# Altium PCB Main-PCB-v1.0.PcbDoc (part 1 of 5)
Units mil, origin at the board's own origin, x right, y up, seen from the top; angles counter-clockwise.
Board outline 8760 x 2778 mil, 2 copper layers (Top Layer, Bottom Layer), stack 57 mil thick; 252 components, 204 nets, 813 pads, 473 vias.
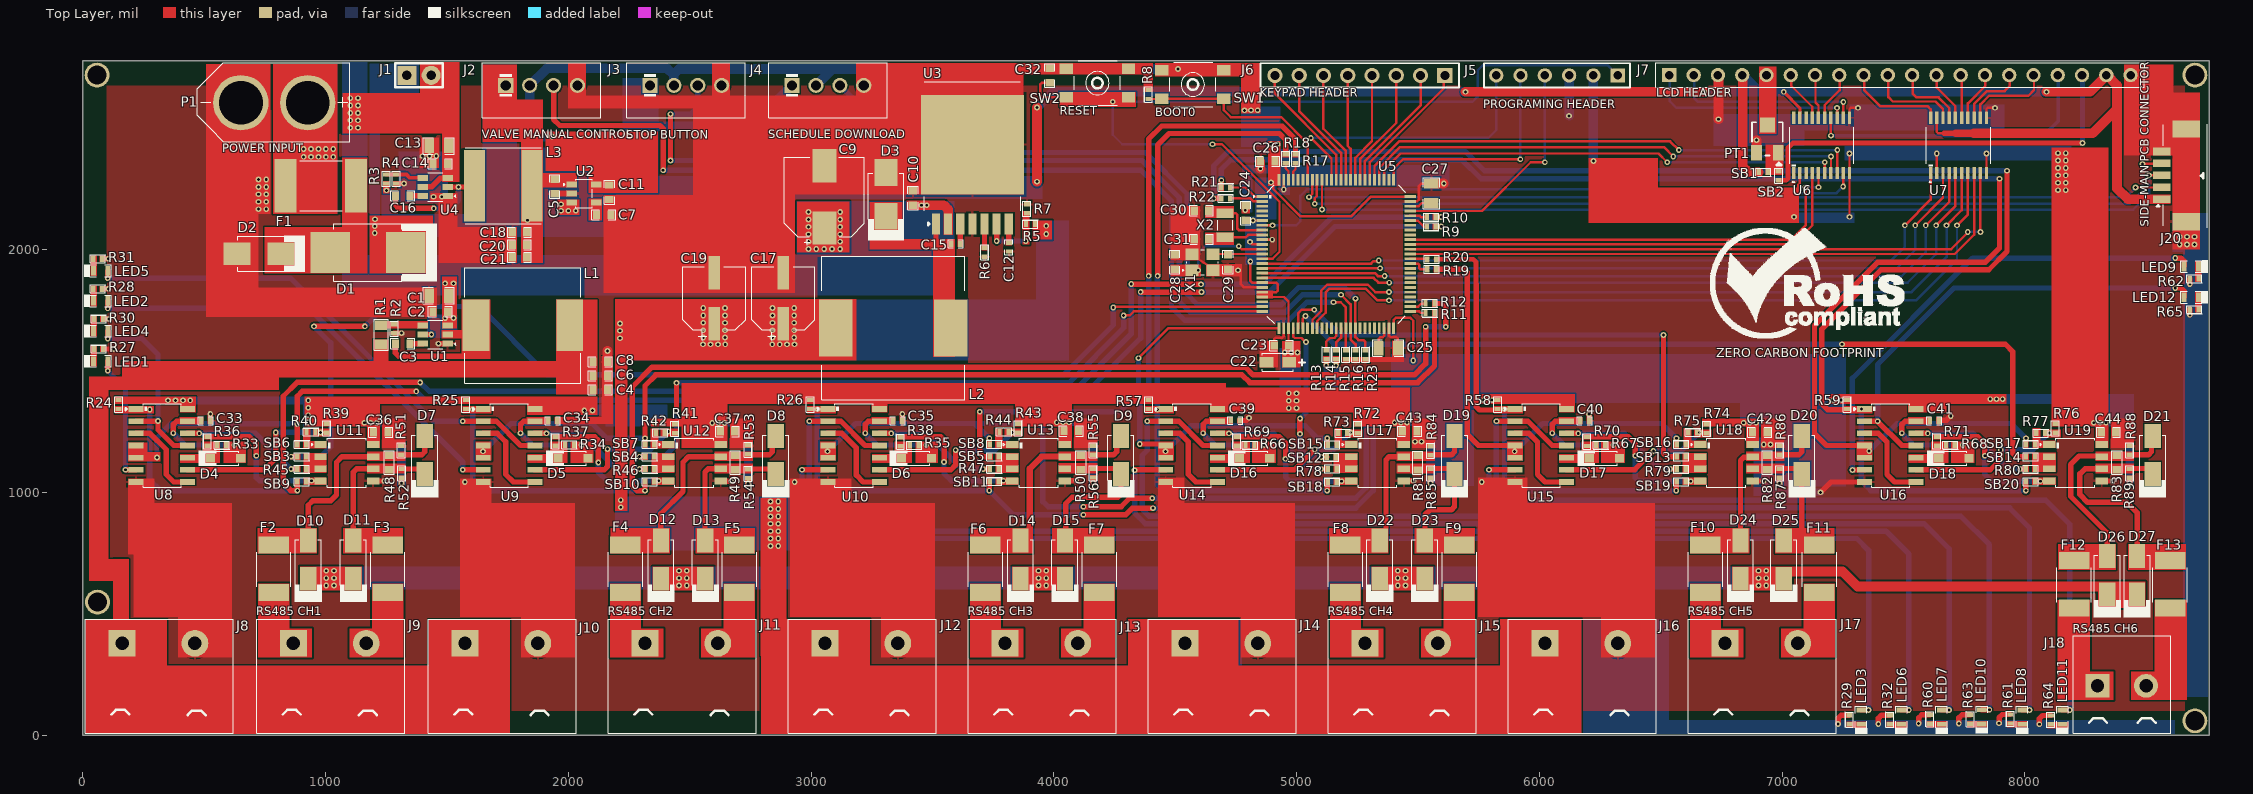
[diagram p0: Top Layer view]
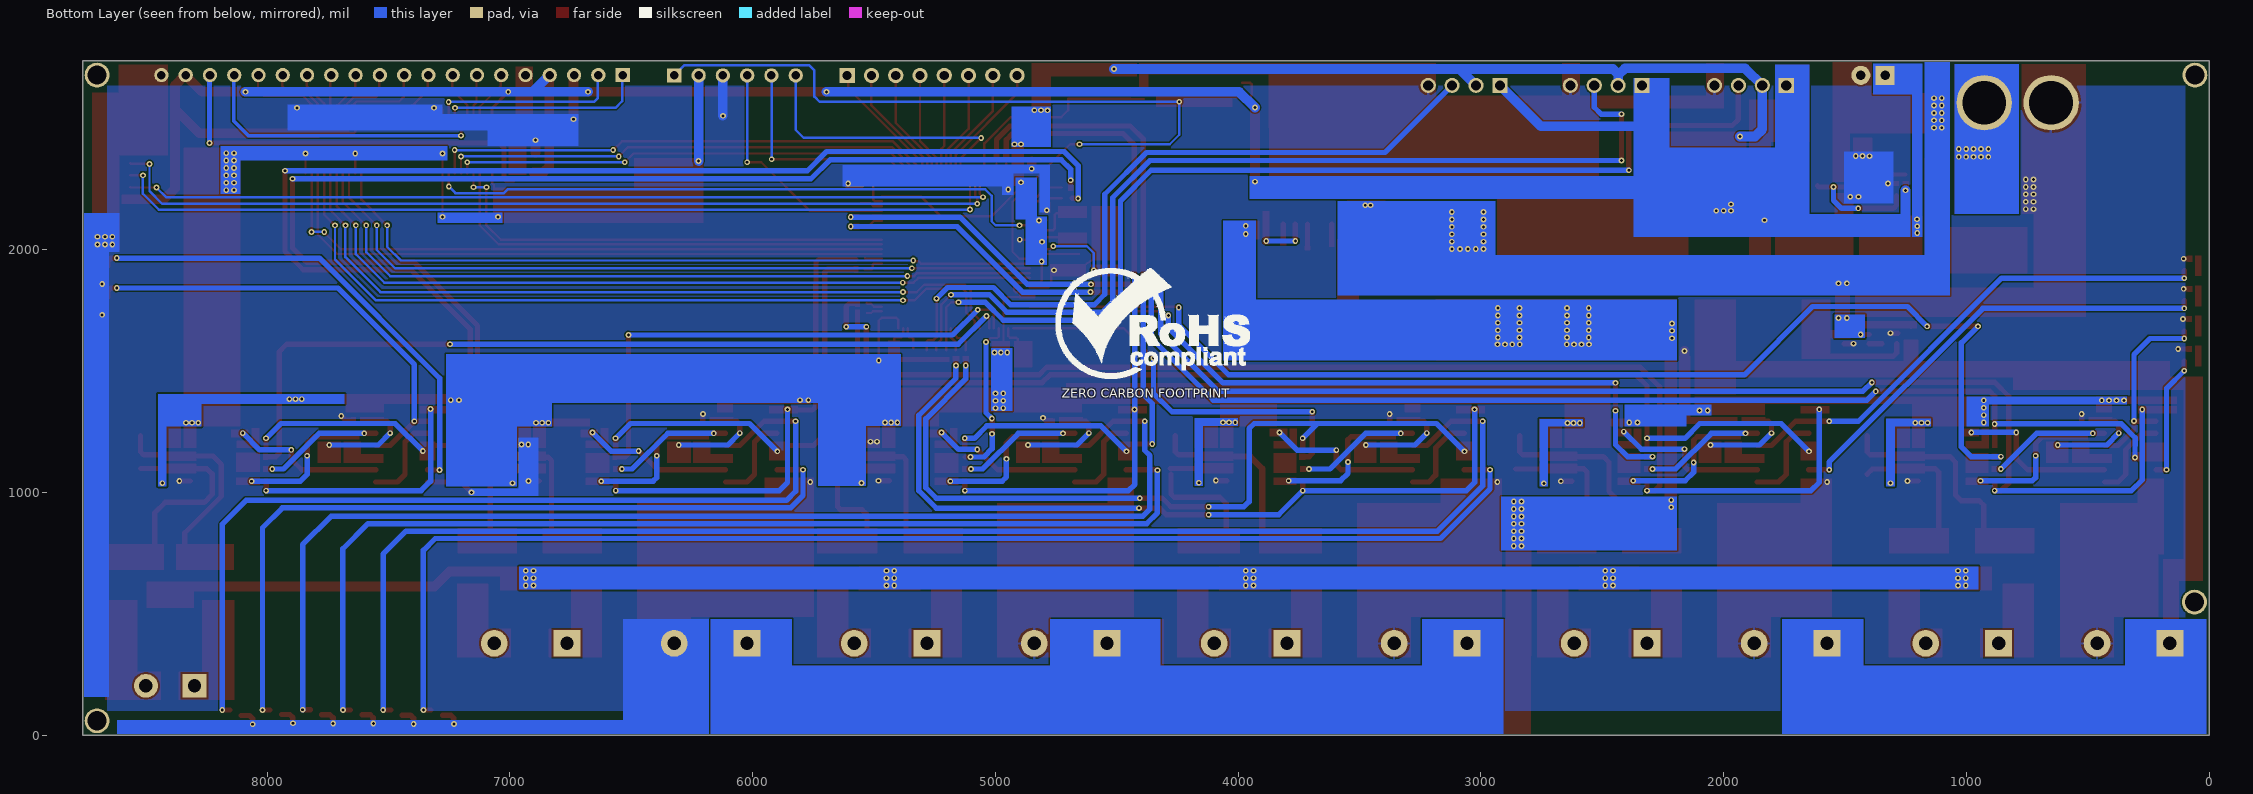
[diagram p1: Bottom Layer view, seen from below]
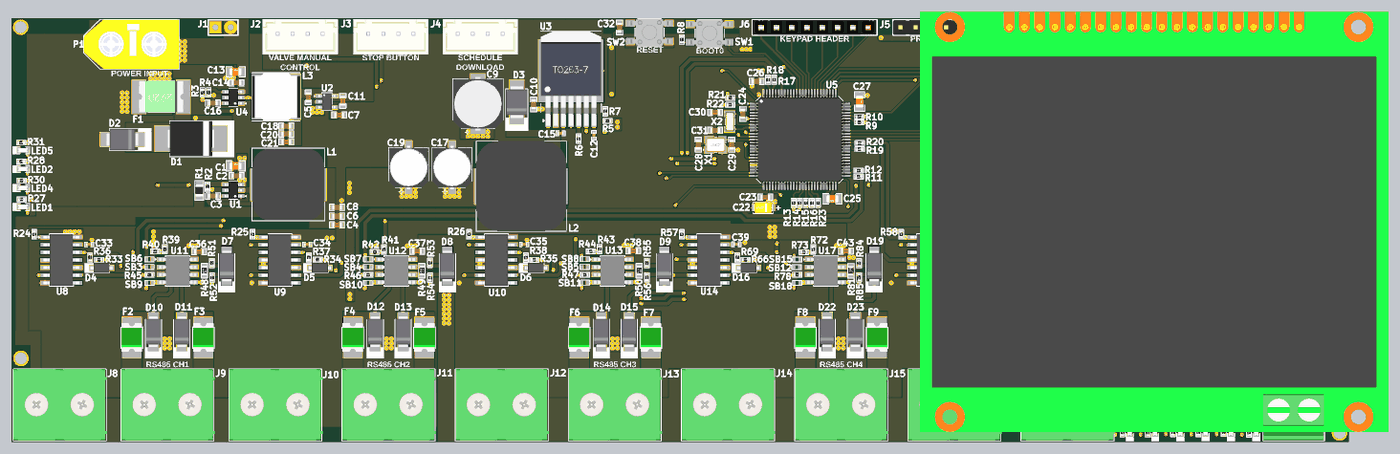
[diagram p4: 3D render of the assembled board from above, using the file's embedded part models]

## Layer stack, top to bottom
Top Solder: solder mask 3, Solder Resist, Dk 3.5
Top Layer: signal copper 10
Dielectric 1: dielectric 37, FR-4, Dk 4.8
Bottom Layer: signal copper 10
Bottom Solder: solder mask 3, Solder Resist, Dk 3.5

## Board outline
0,0 0,2778 8760,2778 8760,0

## Design rules (kind name [scope] priority, off if disabled: settings)
Clearance [All] p1: gap=7 ignorepadtopadclearanceinfootprint=FALSE except(0: Arc-Hole Track-Hole SMDPad-Hole THPad-Hole Via-Hole Fill-Hole Poly-Hole Region-Hole Text-Hole; 4: Arc-SMDPad Track-SMDPad SMDPad-SMDPad)
HoleSize [All] p1: absolutevalues=TRUE maxlimit=1000 minlimit=1 maxpercent=80.000 minpercent=20.000
MinimumSolderMaskSliver [All] p1: minsoldermaskwidth=0
PolygonConnect [All] p1: thpad.connectstyle=Relief thpad.reliefconductorwidth=10 thpad.reliefentries=4 thpad.polygonreliefangle="90 Angle" thpad.airgapwidth=10 smdpad.connectstyle=Relief smdpad.reliefconductorwidth=10 smdpad.reliefentries=4 smdpad.polygonreliefangle="90 Angle" smdpad.airgapwidth=10 via.connectstyle=Direct via.reliefconductorwidth=10 via.reliefentries=4 via.polygonreliefangle="90 Angle" via.airgapwidth=10
RoutingVias [All] p1: holewidth=11.81 width=23.62 viastyle="Through Hole" minholewidth=11.81 minwidth=23.62 maxholewidth=11.81 maxwidth=23.62
SilkToSilkClearance [All] p1: silktosilkclearance=0
SilkToSolderMaskClearance [IsPad] p1: minsilkscreentomaskgap=0 clearancetoexposedcopper=TRUE
SolderMaskExpansion [All] p1: expansion=4 istentingtop=FALSE
Width [All] p1: maxlimit=50 minlimit=10 preferedwidth=22 minimp=50.000000 maximp=50.000000 favimp=50.000000
26 further rules are at their usual default settings.

## Classes and differential pairs
component class U_RS485-UART: C33 C34 C35 C36 C37 C38 C39 C40 C41 C42 C43 C44 D4 D5 D6 D7 D8 D9 D10 D11 D12 D13 D14 D15 D16 D17 D18 D19 D20 D21 D22 D23 D24 D25 D26 D27 F2 F3 F4 F5 F6 F7 F8 F9 F10 F11 F12 F13 J8 J9 J10 J11 J12 J13 J14 J15 J16 J17 J18 LED1 LED2 LED3 LED4 LED5 LED6 LED7 LED8 LED9 LED10 LED11 LED12 R24 R25 R26 R27 R28 R29 R30 R31 R32 R33 R34 R35 R36 R37 R38 R39 R40 R41 R42 R43 R44 R45 R46 R47 R48 R49 R50 R51 R52 R53 R54 R55 R56 R57 R58 R59 R60 R61 R62 R63 R64 R65 R66 R67 R68 R69 R70 R71 R72 R73 R74 R75 R76 R77 R78 R79 R80 R81 R82 R83 R84 R85 R86 R87 R88 R89 SB3 SB4 SB5 SB6 SB7 SB8 SB9 SB10 SB11 SB12 SB13 SB14 SB15 SB16 SB17 SB18 SB19 SB20 U8 U9 U10 U11 U12 U13 U14 U15 U16 U17 U18 U19
component class U_Power-Sheet: C1 C2 C3 C4 C5 C6 C7 C8 C9 C10 C11 C12 C13 C14 C15 C16 C17 C18 C19 C20 C21 D1 D2 D3 F1 J1 L1 L2 L3 P1 R1 R2 R3 R4 R5 R6 R7 U1 U2 U3 U4
component class U_Controller-Sheet: C22 C23 C24 C25 C26 C27 C28 C29 C30 C31 C32 J2 J3 J4 J5 J6 J7 J20 PT1 R8 R9 R10 R11 R12 R13 R14 R15 R16 R17 R18 R19 R20 R21 R22 R23 SB1 SB2 SW1 SW2 U5 U6 U7 X1 X2

## Components (designator, comment, footprint, x,y, rotation, side; value= is the part's Value field where it differs from the comment)
C1 "2.2uF" Cap-0805 1467.2,1810 r0 top locked
C2 "100nF" Cap-0603 1473.2,1745 r0 top locked
C3 "100nF" Cap-0603 1318,1613 r0 top
C4 "10uF" Cap-0603 2131.8,1423 r180 top locked
C5 "2.2uF" CAP-0603 1944,2260 r90 top
C6 "10uF" Cap-0603 2131.8,1480.5 r180 top locked
C7 "10nF" Cap-0603 2146,2143 r180 top
C8 "10uF" Cap-0603 2131.8,1538 r180 top locked
C9 "100uF" UUD-100uF-8mmDia 3054.8,2217 r90 top locked
C10 "100nF" Cap-0603 3420,2213 r270 top
C11 "2.2uF" CAP-0603 2169.8,2236 r270 top locked
C12 "10nF" Cap-0402 3814.8,2010.5 r90 top
C13 "2.2uF" Cap-0805 1467.2,2427 r0 top locked
C14 "100nF" Cap-0603 1473.2,2354 r0 top locked
C15 "10nF" Cap-0402 3596.3,2024 r0 top locked
C16 "100nF" Cap-0603 1318.2,2222 r0 top locked
C17 "27uF" VUA270M1VTR-0606 2885.8,1800.12 r90 top locked
C18 "10uF" Cap-0603 1799.2,2071 r0 top locked
C19 "27uF" VUA270M1VTR-0606 2600.8,1800.12 r90 top locked
C20 "10uF" Cap-0603 1799.2,2019.5 r0 top locked
C21 "10uF" Cap-0603 1799.2,1968 r0 top locked
C22 "10uF" Case-A 4923.55,1536 r180 top
C23 "100nF" Cap-0603 4937.8,1605 r0 top
C24 "100nF" Cap-0603 4790.8,2151 r270 top
C25 "2.2uF" Cap-0805 5377.8,1594 r180 top locked
C26 "100nF" Cap-0603 4881,2364 r0 top
C27 "2.2uF" Cap-0805 5555.8,2232 r270 top locked
C28 "20pF" Cap-0603 4498.8,1949 r270 top locked
C29 "20pF" Cap-0603 4717.8,1949 r90 top locked
C30 "10pF" Cap-0603 4608.8,2161 r180 top
C31 "10pF" Cap-0603 4608.8,2043 r180 top
C32 "100nF" Cap-0603 3983,2717 r270 top locked
C33 "22nF" Cap-0402 507,1295 r180 top locked
C34 "22nF" Cap-0402 1936.8,1295 r180 top
C35 "22nF" Cap-0402 3357.8,1295 r180 top
C36 "100nF" Cap-0603 1227.8,1248 r180 top locked
C37 "100nF" Cap-0603 2656,1251 r180 top
C38 "100nF" Cap-0603 4072,1253 r180 top
C39 "22nF" Cap-0402 4748,1296 r180 top
C40 "22nF" Cap-0402 6186.8,1295 r180 top
C41 "22nF" Cap-0402 7626.8,1295 r180 top
C42 "100nF" Cap-0603 6908.8,1248 r180 top
C43 "100nF" Cap-0603 5466,1252 r180 top
C44 "100nF" Cap-0603 8344.8,1248 r180 top
D1 "SK104C" SMC 1175,1988 r180 top
D2 "SMBJ36CA" SMB_ 726,1983 r0 top locked
D3 "SK220-LTP" SMB_ 3309,2227.55 r270 top locked
D4 "1N4148W-7-F" SOD-123 588.8,1141 r180 top locked value=2pF
D5 "1N4148W-7-F" SOD-123 2019.8,1141 r180 top locked value=2pF
D6 "1N4148W-7-F" SOD-123 3434.8,1141 r180 top value=2pF
D7 "SMAJ6.5CA" SMA 1408.8,1154 r90 top locked
D8 "SMAJ6.5CA" SMA 2854.8,1154 r90 top locked
D9 "SMAJ6.5CA" SMA 4276.8,1154 r90 top
D10 "SMAJ6.5CA" SMA 929,722.93 r90 top locked
D11 "SMAJ6.5CA" SMA 1114.8,722.93 r90 top locked
D12 "SMAJ6.5CA" SMA 2382,722.93 r90 top locked
D13 "SMAJ6.5CA" SMA 2564.8,722.93 r90 top locked
D14 "SMAJ6.5CA" SMA 3863,722.93 r90 top locked
D15 "SMAJ6.5CA" SMA 4046,722.93 r90 top locked
D16 "1N4148W-7-F" SOD-123 4827.8,1141 r180 top value=2pF
D17 "1N4148W-7-F" SOD-123 6267.8,1141 r180 top value=2pF
D18 "1N4148W-7-F" SOD-123 7707.8,1141 r180 top value=2pF
D19 "SMAJ6.5CA" SMA 5651.09,1154 r90 top
D20 "SMAJ6.5CA" SMA 7081.8,1154 r90 top
D21 "SMAJ6.5CA" SMA 8526.8,1154 r90 top
D22 "SMAJ6.5CA" SMA 5343,722.93 r90 top locked
D23 "SMAJ6.5CA" SMA 5528,722.93 r90 top locked
D24 "SMAJ6.5CA" SMA 6829,722.93 r90 top locked
D25 "SMAJ6.5CA" SMA 7007,722.93 r90 top locked
D26 "SMAJ6.5CA" SMA 8339.8,658.9 r90 top
D27 "SMAJ6.5CA" SMA 8462.8,658.9 r90 top
F1 "SHV2920P500-30-AA" Fuse-2920 980,2263 r0 top locked
F2 "MF-MSMF010-2" Fuse-1812_ 786.87,685 r270 top locked
F3 "MF-MSMF010-2" Fuse-1812_ 1256.37,685 r270 top locked
F4 "MF-MSMF010-2" Fuse-1812_ 2235.2,685 r270 top locked
F5 "MF-MSMF010-2" Fuse-1812_ 2704.7,685 r270 top locked
F6 "MF-MSMF010-2" Fuse-1812_ 3718.13,685 r270 top locked
F7 "MF-MSMF010-2" Fuse-1812_ 4187.63,685 r270 top locked
F8 "MF-MSMF010-2" Fuse-1812_ 5201.07,685 r270 top locked
F9 "MF-MSMF010-2" Fuse-1812_ 5670.57,685 r270 top locked
F10 "MF-MSMF010-2" Fuse-1812_ 6684,685 r270 top locked
F11 "MF-MSMF010-2" Fuse-1812_ 7153.5,685 r270 top locked
F12 "MF-MSMF010-2" Fuse-1812_ 8203.8,620.97 r270 top
F13 "MF-MSMF010-2" Fuse-1812_ 8598.8,620.97 r270 top
J1 "2P THrough Hole Pads" "2P THrough Hole Pads" 1385,2718 r0 top locked
J2 "B4B-XH-A(LF)(SN)" B4B-XH-A(LF)(SN). 1742.72,2676.48 r0 top locked
J3 "B4B-XH-A(LF)(SN)" B4B-XH-A(LF)(SN). 2336.72,2676.48 r0 top
J4 "B4B-XH-A(LF)(SN)" B4B-XH-A(LF)(SN). 2922.15,2676.48 r0 top
J5 "61300611121" HDR1X6_ 6323,2717.56 r180 top locked
J6 "KH-2.54FH-1X8P-H8.5" "HDR1X8 Female" 5261,2717.56 r180 top locked
J7 "NHD-12864WG-CTFH-V#N" NHD-12864WG-CTFH-V#N 7486,2719 r0 top
J8 "JL762B-76202GA1" JL762B-76202GA1 162,378 r0 top locked
J9 "JL762B-76202GA1" JL762B-76202GA1 867.87,378 r0 top locked
J10 "JL762B-76202GA1" JL762B-76202GA1 1574.73,378 r0 top locked
J11 "JL762B-76202GA1" JL762B-76202GA1 2316.2,378 r0 top locked
J12 "JL762B-76202GA1" JL762B-76202GA1 3057.67,378 r0 top locked
J13 "JL762B-76202GA1" JL762B-76202GA1 3799.13,378 r0 top locked
J14 "JL762B-76202GA1" JL762B-76202GA1 4540.6,378 r0 top locked
J15 "JL762B-76202GA1" JL762B-76202GA1 5282.07,378 r0 top locked
J16 "JL762B-76202GA1" JL762B-76202GA1 6023.53,378 r0 top locked
J17 "JL762B-76202GA1" JL762B-76202GA1 6765,378 r0 top locked
J18 "WJ500V-5.08-2P" "Terminal Block 2P_" 8399.8,203.15 r0 top locked
J20 "1.25-5PWB" 1.25-5PWB 8614.8,2305.94 r90 top locked
L1 "22UH" YPRH1204-220M_ 1813,1688 r0 top locked
L2 "33uH" YPRH1508-330M 3338.57,1677 r180 top locked
L3 "10uH" SWPA8040S100MT 1732.2,2263 r0 top locked
LED1 "Emerald" LED-0603 73.5,1540.54 r180 top locked
LED2 "Emerald" LED-0603 73.5,1788.76 r180 top locked
LED3 "Emerald" LED-0603 7326.11,74 r270 top locked
LED4 "Emerald" LED-0603 73.5,1664.65 r180 top locked
LED5 "Emerald" LED-0603 73.5,1912.87 r180 top locked
LED6 "Emerald" LED-0603 7491.88,74 r270 top locked
LED7 "Emerald" LED-0603 7657.65,74 r270 top locked
LED8 "Emerald" LED-0603 7989.18,74 r270 top locked
LED9 "Emerald" LED-0603 8686,1930.32 r0 top locked
LED10 "Emerald" LED-0603 7823.41,75 r270 top locked
LED11 "Emerald" LED-0603 8154.95,74 r270 top locked
LED12 "Emerald" LED-0603 8686,1803.68 r0 top locked
P1 "PRT-10474" PRT-10474 789,2605 r0 top locked
PT1 "10K" 3313J-1-103E 6940.2,2455.91 r0 top locked value=10kR
R1 "422k" RES-0805 1229,1649 r270 top value=422kR
R2 "22.1K" Res-0402 1283.2,1674.5 r90 top locked value=22.1kR
R3 "162k" Res-0402 1250.2,2291 r270 top locked value=162kR
R4 "22.1K" Res-0402 1291.2,2291 r90 top locked value=22.1kR
R5 "18.7K" Res-0402 3904,2105 r180 top locked value=18.7kR
R6 "6.98K" Res-0402 3714.8,1989 r90 top locked value=6.98kR
R7 "1K" Res-0402 3889,2168 r270 top locked
R8 "10K" Res-0402 4390,2639 r270 top locked
R9 "0R" Res-0402 5554.8,2095 r0 top
R10 "0R" Res-0402 5554.8,2134 r0 top
R11 "0R" Res-0402 5549.8,1739 r0 top
R12 "0R" Res-0402 5549.8,1779 r0 top
R13 "0R" Res-0402 5122.8,1567 r270 top
R14 "0R" Res-0402 5163.05,1567 r270 top
R15 "10K" Res-0402 5203.3,1567 r90 top
R16 "10K" Res-0402 5243.55,1567 r90 top
R17 "0R" Res-0402 4995.8,2375 r90 top
R18 "0R" Res-0402 4955.8,2375 r90 top
R19 "0R" Res-0402 5556.5,1919 r0 top
R20 "0R" Res-0402 5556.5,1960 r0 top
R21 "0R" Res-0402 4708.8,2256 r180 top locked
R22 "0R" Res-0402 4707.8,2211 r180 top locked
R23 "10K" Res-0402 5283.8,1567 r90 top
R24 "4.7K" Res-0402 147.8,1362 r90 top locked
R25 "4.7K" Res-0402 1578,1362 r90 top locked
R26 "4.7K" Res-0402 2996.8,1362 r90 top
R27 "2.4k" Res-0402 65.5,1590.67 r180 top locked value=2.4kR
R28 "2.4k" Res-0402 62.5,1838.44 r180 top locked value=2.4kR
R29 "2.4k" Res-0402 7278,63.5 r270 top locked value=2.4kR
R30 "2.4k" Res-0402 65.5,1714.56 r180 top locked value=2.4kR
R31 "2.4k" Res-0402 62.5,1962.33 r180 top locked value=2.4kR
R32 "2.4k" Res-0402 7443.88,63.5 r270 top locked value=2.4kR
R33 "56k" Res-0402 572.8,1195 r0 top locked value=56kR
R34 "56k" Res-0402 2005,1196 r0 top value=56kR
R35 "56k" Res-0402 3425,1194 r0 top value=56kR
R36 "0R" Res-0402 513.8,1210.5 r270 top locked
R37 "0R" Res-0402 1947,1211 r270 top
R38 "0R" Res-0402 3369,1209 r270 top
R39 "4.7K" Res-0402 1003.8,1263.5 r90 top locked
R40 "0R" Res-0402 940.3,1248.5 r180 top locked
R41 "4.7K" Res-0402 2439,1262 r90 top
R42 "0R" Res-0402 2379,1245.5 r180 top
R43 "4.7K" Res-0402 3853,1264.5 r90 top
R44 "0R" Res-0402 3795,1249.5 r180 top
R45 "0R" Res-0402 902.8,1096 r0 top locked
R46 "0R" Res-0402 2336.3,1096 r0 top locked
R47 "0R" Res-0402 3755,1096 r0 top
R48 "120R" Res-0603 1262.8,1123 r90 top locked
R49 "120R" Res-0603 2687.8,1123 r90 top locked
R50 "120R" Res-0603 4112.02,1123 r90 top
R51 "4.7K" Res-0402 1311.8,1173 r90 top locked
R52 "4.7K" Res-0402 1312.8,1078 r90 top locked
R53 "4.7K" Res-0402 2740.8,1175 r90 top
R54 "4.7K" Res-0402 2740.8,1077 r90 top
R55 "4.7K" Res-0402 4162,1173 r90 top
R56 "4.7K" Res-0402 4162,1079.5 r90 top
R57 "4.7K" Res-0402 4390.8,1362 r90 top
R58 "4.7K" Res-0402 5828.8,1362 r90 top
R59 "4.7K" Res-0402 7267.8,1362 r90 top
R60 "2.4k" Res-0402 7609.65,65.5 r270 top locked value=2.4kR
R61 "2.4k" Res-0402 7941.18,66.5 r270 top locked value=2.4kR
R62 "2.4k" Res-0402 8698.5,1880.32 r0 top locked value=2.4kR
R63 "2.4k" Res-0402 7775.41,65.5 r270 top locked value=2.4kR
R64 "2.4k" Res-0402 8106.95,62.5 r270 top locked value=2.4kR
R65 "2.4k" Res-0402 8698.5,1753.68 r0 top locked value=2.4kR
R66 "56k" Res-0402 4808.5,1195 r0 top value=56kR
R67 "56k" Res-0402 6253.5,1195 r0 top value=56kR
R68 "56k" Res-0402 7693.8,1195 r0 top value=56kR
R69 "0R" Res-0402 4755,1211 r270 top
R70 "0R" Res-0402 6197,1209.5 r270 top
R71 "0R" Res-0402 7637.8,1210.5 r270 top
R72 "4.7K" Res-0402 5252.3,1262.5 r90 top
R73 "0R" Res-0402 5190.3,1244 r180 top
R74 "4.7K" Res-0402 6688.8,1261.5 r90 top
R75 "0R" Res-0402 6632.8,1246.5 r180 top
R76 "4.7K" Res-0402 8126,1264 r90 top
R77 "0R" Res-0402 8066,1244 r180 top
R78 "0R" Res-0402 5147,1097 r0 top
R79 "0R" Res-0402 6584.8,1096 r0 top
R80 "0R" Res-0402 8023.8,1096 r0 top
R81 "120R" Res-0603 5499,1122 r90 top
R82 "120R" Res-0603 6939.8,1123 r90 top
R83 "120R" Res-0603 8379.8,1123 r90 top
R84 "4.7K" Res-0402 5552,1172 r90 top
R85 "4.7K" Res-0402 5552,1079 r90 top
R86 "4.7K" Res-0402 6989.8,1173 r90 top
R87 "4.7K" Res-0402 6989.8,1078 r90 top
R88 "4.7K" Res-0402 8431.8,1173 r90 top
R89 "4.7K" Res-0402 8431.8,1078 r90 top
SB1 "Solder Bridge 0402" "Solder Bridge 0402" 6923,2319 r0 top locked
SB2 "Solder Bridge 0402" "Solder Bridge 0402" 6986.2,2304 r90 top locked
SB3 "Solder Bridge 0402" "Solder Bridge 0402" 902.8,1147 r0 top locked
SB4 "Solder Bridge 0402" "Solder Bridge 0402" 2336.3,1147 r0 top locked
SB5 "Solder Bridge 0402" "Solder Bridge 0402" 3755,1147 r0 top
SB6 "Solder Bridge 0402" "Solder Bridge 0402" 902.8,1197 r180 top locked
SB7 "Solder Bridge 0402" "Solder Bridge 0402" 2336.3,1197 r180 top locked
SB8 "Solder Bridge 0402" "Solder Bridge 0402" 3755,1198 r180 top
SB9 "Solder Bridge 0402" "Solder Bridge 0402" 902.8,1044 r180 top locked
SB10 "Solder Bridge 0402" "Solder Bridge 0402" 2336.3,1044 r180 top locked
SB11 "Solder Bridge 0402" "Solder Bridge 0402" 3755,1045 r180 top
SB12 "Solder Bridge 0402" "Solder Bridge 0402" 5143,1146 r0 top
SB13 "Solder Bridge 0402" "Solder Bridge 0402" 6584.8,1147 r0 top
SB14 "Solder Bridge 0402" "Solder Bridge 0402" 8023.8,1147 r0 top
SB15 "Solder Bridge 0402" "Solder Bridge 0402" 5146.8,1196 r180 top
SB16 "Solder Bridge 0402" "Solder Bridge 0402" 6584.8,1197 r180 top
SB17 "Solder Bridge 0402" "Solder Bridge 0402" 8023.8,1197 r180 top
SB18 "Solder Bridge 0402" "Solder Bridge 0402" 5146.8,1043 r180 top
SB19 "Solder Bridge 0402" "Solder Bridge 0402" 6584.8,1044 r180 top
SB20 "Solder Bridge 0402" "Solder Bridge 0402" 8023.8,1044 r180 top
SW1 "TS-1109S-C-B" TS-1109S-C-B 4573,2680 r0 top locked
SW2 "TS-1109S-C-B" TS-1109S-C-B 4179.74,2686 r0 top locked
U1 "LMR51420YDDCR" "SOT-23-6 THIN" 1452.2,1650 r180 top locked
U2 "SPX3819M5-L-3-3/TR" SOT-23-5 2064.8,2231 r0 top locked
U3 "LM2679SX-ADJ/NOPB" TO-263-7 3664.8,2269 r0 top locked
U4 "LMR51420YDDCR" "SOT-23-6 THIN" 1452.2,2258 r180 top locked
U5 "STM32F413VGT6" LQFP-100 5163.8,1982 r0 top locked
U6 "TXB0108PWR" TSSOP-20 7163,2429 r90 top locked
U7 "TXB0108PWR" TSSOP-20 7727.2,2429 r90 top
U8 "SN74HC04NSR" 14-SOIC 325.5,1193 r0 top locked
U9 "SN74HC04NSR" 14-SOIC 1756.09,1193 r0 top
U10 "SN74HC04NSR" 14-SOIC 3175.8,1193 r0 top
U11 "SP3485EIM/TR" SOP-8 1087.8,1122 r0 top locked
U12 "SP3485EIM/TR" SOP-8 2519.8,1122 r0 top locked
U13 "SP3485EIM/TR" SOP-8 3937.8,1122 r0 top
U14 "SN74HC04NSR" 14-SOIC 4567.8,1193 r0 top
U15 "SN74HC04NSR" 14-SOIC 6006.09,1193 r0 top
U16 "SN74HC04NSR" 14-SOIC 7446.09,1193 r0 top
U17 "SP3485EIM/TR" SOP-8 5334,1122 r0 top
U18 "SP3485EIM/TR" SOP-8 6770.8,1122 r0 top
U19 "SP3485EIM/TR" SOP-8 8208.8,1122 r0 top
X1 "X322516MLB4SI" SMD3225-4P 4612.8,1948 r0 top locked
X2 "32.7680KHZ" NX3215SA-32.768K-STD-MUA-8_ 4705.8,2100.21 r270 top locked

## Footprints (in the part's own frame and the unit in brackets; to place one, negate y for a bottom-side part, rotate by r counter-clockwise, add the part's x,y. Pads: shape width x height; smd on the part's side, far side on the other; paste and mask are expansions set on the pad)
1.25-5PWB [mm]
  rect 0.8x1.8 smd: 1(-2.5,1.275) 2(-1.25,1.275) 3(0,1.275) 4(1.25,1.275) 5(2.5,1.275)
  rect 1.8x2.9 smd: MP1(-4.85,-1.275) MP2(4.85,-1.275)
  silkscreen extent -5.47,-3.47 5.35,1.78, body extent -5.5,-4.32 5.5,1.73, height 3.56
"2P THrough Hole Pads" [mm]
  rect 2x2 hole 1: 1(-1.27,0)
  round 2 hole 1: 2(1.27,0)
  silkscreen extent -2.49,-1.27 2.49,1.27
14-SOIC [mm]
  rect 1.55x0.6 smd: 1(-2.7,3.81) 2(-2.7,2.54) 3(-2.7,1.27) 4(-2.7,0) 5(-2.7,-1.27) 6(-2.7,-2.54) 7(-2.7,-3.81) 8(2.7,-3.81) 9(2.7,-2.54) 10(2.7,-1.27) 11(2.7,0) 12(2.7,1.27) 13(2.7,2.54) 14(2.7,3.81)
  silkscreen extent -3.78,-4.37 2.03,4.37, body extent -3,-4.33 3,4.33, height 1.75
3313J-1-103E [mm]
  rect 1.1x1.6 smd paste+0: 1(1.15,-1.45) 3(-1.15,-1.45)
  rect 1.6x1.6 smd paste+0: 2(0,1.45)
  silkscreen extent -1.6,-2.74 1.6,1.75, body extent -1.65,-1.75 1.65,1.75, height 2.11
B4B-XH-A(LF)(SN). [mm]
  rect 1.59x1.59 hole 1.06: 1(0,0)
  round 1.59 hole 1.06: 2(2.5,0) 3(5,0) 4(7.5,0)
  silkscreen extent -2.45,-3.4 9.95,2.35, body extent -2.45,-3.4 9.95,2.35, height 7
Cap-0402 [mil]
  rect 18x25 smd mask+2.36: 1(-18.5,0) 2(18.5,0)
  silkscreen extent -31,-16 31,16, body extent -20,-10 20,10, height 19
Cap-0603 [mil]
  rect 30x35 smd mask+2.36: 1(-30,0) 2(30,0)
  silkscreen extent -49,-21 49,21, body extent -32,-16 31,16, height 34
CAP-0603 [mil]
  rect 30x35 smd mask+2.36: 1(-30,0) 2(30,0)
  silkscreen extent -49,-21 49,21, body extent -32,-16 31,16, height 34
Cap-0805 [mil] "SMD 0805"
  rect 40x60 smd mask+2.76: 1(-40,0) 2(40,0)
  silkscreen extent -64,-34 64,34, body extent -39,-25 39,25, height 30
Case-A [mm]
  rect 1.42x1.13 smd: 1(-1.2,0) 2(1.2,0)
  silkscreen extent -2.82,-0.97 1.63,0.97, body extent -1.6,-0.9 1.6,0.9, height 1.8
Fuse-1812_ [mm]
  rect 1.78x3.2 smd: 1(-2.49,0) 2(2.49,0)
  silkscreen extent -1.75,-1.8 1.85,1.8, body extent -2.36,-1.74 2.37,1.74, height 1.03
Fuse-2920 [mm]
  rect 2.3x5.6 smd: 1(-3.7,0) 2(3.7,0)
  silkscreen extent -2.18,-2.62 2.24,2.62, body extent -3.68,-2.56 3.68,2.56, height 0.9
HDR1X6_ [mm] "Connector; Header; 6 Position"
  rect 1.5x1.5 hole 0.9: 1(0,0)
  round 1.5 hole 0.9: 2(2.54,0) 3(5.08,0) 4(7.62,0) 5(10.16,0) 6(12.7,0)
  silkscreen extent -1.27,-1.27 13.97,1.27, body extent -1.27,-1.24 13.97,1.25, height 8.54
"HDR1X8 Female" [mm] "Connector; Header; 8 Position"
  rect 1.6x1.6 hole 0.95: 1(-8.89,0)
  round 1.6 hole 0.95: 2(-6.35,0) 3(-3.81,0) 4(-1.27,0) 5(1.27,0) 6(3.81,0) 7(6.35,0) 8(8.89,0)
  silkscreen extent -10.39,-1.27 10.39,1.27, body extent -10.29,-1.25 10.29,1.25, height 8.5
JL762B-76202GA1 [mm]
  rect 2.8x2.8 hole 1.4: 1(0,0)
  round 2.8 hole 1.4: 2(7.62,0)
  silkscreen extent -3.86,-9.4 11.63,2.54, body extent -3.79,-9.32 11.73,2.57, height 12.97
LED-0603 [mm]
  rect 0.5x1 smd: 1(-0.75,0) 2(0.75,0)
  silkscreen extent -1.12,-0.66 1.75,0.66, body extent -0.82,-0.37 0.82,0.36, height 0.68
LQFP-100 [mm]
  rect 1.2x0.3 smd: 1(-7.75,6) 2(-7.75,5.5) 3(-7.75,5) 4(-7.75,4.5) 5(-7.75,4) 6(-7.75,3.5) 7(-7.75,3) 8(-7.75,2.5) 9(-7.75,2) 10(-7.75,1.5) 11(-7.75,1) 12(-7.75,0.5) 13(-7.75,0) 14(-7.75,-0.5) 15(-7.75,-1) 16(-7.75,-1.5) 17(-7.75,-2) 18(-7.75,-2.5) 19(-7.75,-3) 20(-7.75,-3.5) 21(-7.75,-4) 22(-7.75,-4.5) 23(-7.75,-5) 24(-7.75,-5.5) 25(-7.75,-6) 51(7.75,-6) 52(7.75,-5.5) 53(7.75,-5) 54(7.75,-4.5) 55(7.75,-4) 56(7.75,-3.5) 57(7.75,-3) 58(7.75,-2.5) 59(7.75,-2) 60(7.75,-1.5) 61(7.75,-1) 62(7.75,-0.5) 63(7.75,0) 64(7.75,0.5) 65(7.75,1) 66(7.75,1.5) 67(7.75,2) 68(7.75,2.5) 69(7.75,3) 70(7.75,3.5) 71(7.75,4) 72(7.75,4.5) 73(7.75,5) 74(7.75,5.5) 75(7.75,6)
  rect 0.3x1.2 smd: 26(-6,-7.75) 27(-5.5,-7.75) 28(-5,-7.75) 29(-4.5,-7.75) 30(-4,-7.75) 31(-3.5,-7.75) 32(-3,-7.75) 33(-2.5,-7.75) 34(-2,-7.75) 35(-1.5,-7.75) 36(-1,-7.75) 37(-0.5,-7.75) 38(0,-7.75) 39(0.5,-7.75) 40(1,-7.75) 41(1.5,-7.75) 42(2,-7.75) 43(2.5,-7.75) 44(3,-7.75) 45(3.5,-7.75) 46(4,-7.75) 47(4.5,-7.75) 48(5,-7.75) 49(5.5,-7.75) 50(6,-7.75) 76(6,7.75) 77(5.5,7.75) 78(5,7.75) 79(4.5,7.75) 80(4,7.75) 81(3.5,7.75) 82(3,7.75) 83(2.5,7.75) 84(2,7.75) 85(1.5,7.75) 86(1,7.75) 87(0.5,7.75) 88(0,7.75) 89(-0.5,7.75) 90(-1,7.75) 91(-1.5,7.75) 92(-2,7.75) 93(-2.5,7.75) 94(-3,7.75) 95(-3.5,7.75) 96(-4,7.75) 97(-4.5,7.75) 98(-5,7.75) 99(-5.5,7.75) 100(-6,7.75)
  silkscreen extent -8.64,-7.27 7.24,7.24, body extent -8,-8 8,8, height 1.6
NHD-12864WG-CTFH-V#N [mm]
  rect 1.5x1.5 hole 0.9: 1(-24.13,0)
  round 1.5 hole 0.9: 2(-21.59,0) 3(-19.05,0) 4(-16.51,0) 5(-13.97,0) 6(-11.43,0) 7(-8.89,0) 8(-6.35,0) 9(-3.81,0) 10(-1.27,0) 11(1.27,0) 12(3.81,0) 13(6.35,0) 14(8.89,0) 15(11.43,0) 16(13.97,0) 17(16.51,0) 18(19.05,0) 19(21.59,0) 20(24.13,0)
  silkscreen extent -25.58,-1.27 25.58,1.27, body extent -39,-67.43 39,2.57, height 22.8
NX3215SA-32.768K-STD-MUA-8_ [mm]
  rect 1x1.8 smd: 1(-1.25,0) 2(1.25,0)
  silkscreen extent -0.51,-0.79 0.51,0.79, body extent -1.6,-0.75 1.6,0.75, height 0.8
PRT-10474 [mm]
  round 5.8 hole 4.6: 1(-3.5,0) 2(3.5,0)
  silkscreen extent -8.08,-4.06 7.9,4.19, body extent -8.05,-4.01 7.85,4.14, height 17
Res-0402 [mil]
  rect 18x25 smd mask+2.17: 1(-18.5,0) 2(18.5,0)
  silkscreen extent -32,-17 32,16, body extent -23,-11 23,11, height 16
Res-0603 [mil]
  rect 30x35 smd: 1(-30,0) 2(30,0)
  silkscreen extent -48,-21 48,21, body extent -31,-17 31,17, height 18
RES-0805 [mil] "SMD 0805"
  rect 40x50 smd: 1(-40,0) 2(40,0)
  silkscreen extent -64,-29 64,29, body extent -39,-25 39,24, height 24
SMA [mm]
  rect 2.5x1.7 smd: 1(-2,0) 2(2,0)
  silkscreen extent -4.45,-1.42 2.06,1.42, body extent -2.6,-1.3 2.6,1.3, height 2.4
SMB_ [mm]
  rect 2.8x2.4 smd: 1(-2.3,0) 2(2.3,0)
  silkscreen extent -2.21,-1.91 4.83,1.9, body extent -2.7,-1.8 2.7,1.8, height 2.3
SMC [mm]
  rect 4.1x4.3 smd: 1(-3.95,0) 2(3.95,0)
  silkscreen extent -7.24,-3.05 3.58,3.05, body extent -3.9,-2.95 3.9,2.95, height 2.41
SMD3225-4P [mm]
  rect 1.4x1.2 smd: 1(-1.1,-0.85) 2(1.1,-0.85) 3(1.1,0.85) 4(-1.1,0.85)
  silkscreen extent -2.08,-1.3 1.65,1.3, body extent -1.6,-1.25 1.6,1.25, height 0.81
SOD-123 [mm]
  rect 0.95x0.9 smd: 1(-1.575,0) 2(1.575,0)
  silkscreen extent -1.37,-0.8 2.82,0.8, body extent -1.82,-0.78 1.83,0.78, height 1.5
"Solder Bridge 0402" [mil]
  rect 18x25 smd mask+2.17: 1(-18.5,0) 2(18.5,0)
  silkscreen extent -32,-17 32,16
SOP-8 [mm]
  rect 1.3x0.7 smd: 1(-2.75,1.905) 2(-2.75,0.635) 3(-2.75,-0.635) 4(-2.75,-1.905) 5(2.75,-1.905) 6(2.75,-0.635) 7(2.75,0.635) 8(2.75,1.905)
  silkscreen extent -3.69,-2.57 2.03,2.57, body extent -3.1,-2.5 3.1,2.5, height 1.76
SOT-23-5 [mm]
  rect 1.1x0.6 smd: 1(-1.3,0.95) 2(-1.3,0) 3(-1.3,-0.95) 4(1.3,-0.95) 5(1.3,0.95)
  silkscreen extent -2.13,-1.5 0.88,1.5, body extent -1.4,-1.45 1.4,1.45, height 1.45
"SOT-23-6 THIN" [mm]
  rect 1.12x0.62 smd: 1(-1.3,0.95) 2(-1.3,0) 3(-1.3,-0.95) 4(1.3,-0.95) 5(1.3,0) 6(1.3,0.95)
  silkscreen extent -2.13,-1.47 0.79,1.47, body extent -1.4,-1.45 1.4,1.45, height 1.44
SWPA8040S100MT [mm]
  rect 2.2x7.5 smd: 1(-3,0) 2(3,0)
  silkscreen extent -4,-4 4,4, body extent -4,-4 4,4, height 5.3
"Terminal Block 2P_" [mm] "TERMINAL BLOCK 2POS 5.08MM SIDE"
  rect 2.5x2.5 hole 1.4: 1(-2.54,0)
  round 2.5 hole 1.4: 2(2.54,0)
  silkscreen extent -5.1,-4.96 5.14,5.22, body extent -5.08,-4.9 5.68,5.2, height 13.8
TO-263-7 [mm]
  rect 0.85x2.16 smd: 1(-3.81,-4.16) 2(-2.54,-4.16) 3(-1.27,-4.16) 4(0,-4.16) 5(1.27,-4.16) 6(2.54,-4.16) 7(3.81,-4.16)
  rect 10.8x10.41 smd: 8(0,4.16)
  silkscreen extent -5.05,-4.26 5.05,10.74, body extent -5,-4.99 5,10.68, height 4.78
TS-1109S-C-B [mm]
  rect 1.4x1.1 smd: 1(-3.25,-1.5) 2(3.25,-1.5) 3(3.25,1.5) 4(-3.25,1.5)
  silkscreen extent -2.41,-2.31 2.41,2.31, body extent -3.5,-2.25 3.5,2.25, height 4.3
TSSOP-20 [mm]
  rect 1.26x0.36 smd: 1(-2.9,2.925) 2(-2.9,2.275) 3(-2.9,1.625) 4(-2.9,0.975) 5(-2.9,0.325) 6(-2.9,-0.325) 7(-2.9,-0.975) 8(-2.9,-1.625) 9(-2.9,-2.275) 10(-2.9,-2.925) 11(2.9,-2.925) 12(2.9,-2.275) 13(2.9,-1.625) 14(2.9,-0.975) 15(2.9,-0.325) 16(2.9,0.325) 17(2.9,0.975) 18(2.9,1.625) 19(2.9,2.275) 20(2.9,2.925)
  silkscreen extent -3.82,-3.35 1.93,3.35, body extent -3.3,-3.3 3.3,3.3, height 1.09
UUD-100uF-8mmDia [mm] "0.327\" L x 0.327\" W (8.30mm x 8.30mm)"
  rect 3.5x2.5 smd: 1(-3.25,0) 2(3.25,0)
  silkscreen extent -5.05,-4.19 4.17,4.19, body extent -4.44,-4.15 4.45,4.15, height 10.06
VUA270M1VTR-0606 [mm]
  rect 3.5x1.2 smd: 1(-2.67,0) 2(2.67,0)
  silkscreen extent -4.42,-3.3 3.3,3.3, body extent -3.6,-3.3 3.6,3.3, height 5.7
YPRH1204-220M_ [mm]
  rect 2.8x5.4 smd: 1(-4.9,0) 2(4.9,0)
  silkscreen extent -6.06,-6.05 6.07,6.05, body extent -5.99,-6 6.01,6, height 5
YPRH1508-330M [mm]
  rect 3.5x6 smd: 1(-6,0) 2(6,0)
  silkscreen extent -7.5,-7.5 7.5,7.5, body extent -7.5,-7.5 7.5,7.5, height 8

## Part data
C1 C13 C25 C27: library part CC0805KKX5R9BB225, "CAP CER 2.2UF 50V X5R 0805", Case Code (Imperial)=0805, Case Code (Metric)=2012, Dielectric=X5R, LCSC Part Number=C326581, Manufacturer=Yageo, Max Operating Temperature=85°C, Min Operating Temperature=-55°C, Package Quantity=3000, Resistor Type=Ceramic, Supplier Part Number 1=603-CC805KKX5R9BB225, Tolerance=10%, Voltage Rating=50V, Case/Package=0805, Category="Ceramic Capacitors", ComponentLink1Description=http://www.mouser.com/ds/2/447/Yageo_UPY-GP_NP0_16V-to-50V_9-358835.pdf?src-supplier=Mouser, ComponentLink1URL=http://www.mouser.com/ds/2/447/Yageo_UPY-GP_NP0_16V-to-50V_9-358835.pdf?src-supplier=Mouser, ComponentLink2Description=http://www.yageo.com/documents/recent/UPY-GPHC_X5R_4V-to-50V_25.pdf?src-supplier=Digi-Key, ComponentLink2URL=http://www.yageo.com/documents/recent/UPY-GPHC_X5R_4V-to-50V_25.pdf?src-supplier=Digi-Key, Halogen Free="Halogen Free", Item Type=Capacitor, Lead Free="Lead Free", Length=0.079inch, Manufacturer Part Number=CC0805KKX5R9BB225, Mounting Technology="Surface Mount", Packaging="Tape and Reel", Pricing 1="1=0.26000, 10=0.12100, 50=0.12100, 100=0.08700, 1000=0.06700, 10000=0.05000 (USD)", RoHS=Yes, RoHS Compliant=Yes, Stock 1=3880, Supplier 1=Mouser, Termination=SMD/SMT, Thickness=0.057inch, Voltage Rating (DC)=50V, Weight=0.000194oz, Width=1.25mm
C2 C3 C10 C14 C16 C23 C24 C26 C32 C36 C37 C38 C42 C43 C44: library part CC0603KRX5R9BB104, "CAP CER 0.1UF 50V X5R 0603", Case Code (Imperial)=0603, Case Code (Metric)=1608, Dielectric=X5R, LCSC Part Number=C110022, Manufacturer=Yageo, Max Operating Temperature=85°C, Min Operating Temperature=-55°C, Package Quantity=4000, Supplier Part Number 1=311-4046-1-ND, Tolerance=10%, Voltage Rating=50V, Capacitance=100nF, Case/Package=0603, Category="Ceramic Capacitors", ComponentLink1Description=http://www.mouser.com/ds/2/447/Yageo_UPY-GP_NP0_16V-to-50V_9-358835.pdf?src-supplier=Mouser, ComponentLink1URL=http://www.mouser.com/ds/2/447/Yageo_UPY-GP_NP0_16V-to-50V_9-358835.pdf?src-supplier=Mouser, ComponentLink2Description=https://www.yageo.com/upload/media/product/productsearch/datasheet/mlcc/UPY-GPHC_X5R_4V-to-50V_26.pdf?src-supplier=Digi-Key, ComponentLink2URL=https://www.yageo.com/upload/media/product/productsearch/datasheet/mlcc/UPY-GPHC_X5R_4V-to-50V_26.pdf?src-supplier=Digi-Key, ComponentLink3Description=http://www.yageo.com/exep/pages/download/literatures/ProductSelectionGuide%202014_Final_2.pdf?src-supplier=Digi-Key, ComponentLink3URL=http://www.yageo.com/exep/pages/download/literatures/ProductSelectionGuide%202014_Final_2.pdf?src-supplier=Digi-Key, Halogen Free="Halogen Free", Item Type=Capacitor, Lead Free="Lead Free", Length=0.063inch, Manufacturer Part Number=CC0603KRX5R9BB104, Mount="Surface Mount", Packaging="Tape and Reel", Pricing 1="1=0.10000, 10=0.05200, 50=0.02820, 100=0.02310, 500=0.01648, 1000=0.01294 (USD)", RoHS=Yes, Stock 1=152253, Supplier 1=Digi-Key, Termination=SMD/SMT, Thickness=0.035inch, Voltage Rating (DC)=50V, Weight=7.1E-05oz, Width=0.031inch
C4 C6 C8 C18 C20 C21: library part CC0603KRX5R6BB106, "CAP CER 10UF 10V X5R 0603", Case Code (Imperial)=0603, Case Code (Metric)=1608, Dielectric=X5R, LCSC Part Number=C326057, Manufacturer=Yageo, Max Operating Temperature=85°C, Min Operating Temperature=-55°C, Package Quantity=4000, Resistor Type=Ceramic, Supplier Part Number 1=311-1782-1-ND, Tolerance=10%, Voltage Rating=10V, Capacitance=10uF, Case/Package=0603, Category="Ceramic Capacitors", ComponentLink1Description=http://www.mouser.com/ds/2/447/Yageo_UPY-GP_NP0_16V-to-50V_9-358835.pdf?src-supplier=Mouser, ComponentLink1URL=http://www.mouser.com/ds/2/447/Yageo_UPY-GP_NP0_16V-to-50V_9-358835.pdf?src-supplier=Mouser, ComponentLink2Description=http://www.yageo.com/documents/recent/UPY-GPHC_X5R_4V-to-50V_25.pdf?src-supplier=Digi-Key, ComponentLink2URL=http://www.yageo.com/documents/recent/UPY-GPHC_X5R_4V-to-50V_25.pdf?src-supplier=Digi-Key, Depth=0.8mm, Halogen Free="Halogen Free", Item Type=Capacitor, Lead Free="Lead Free", Length=0.063inch, Manufacturer Part Number=CC0603KRX5R6BB106, Mount="Surface Mount", Packaging="Tape and Reel", Pricing 1="1=0.24000, 10=0.16300, 50=0.09780, 100=0.08260, 500=0.05654, 1000=0.05001 (USD)", RoHS=Yes, RoHS Compliant=Yes, Stock 1=187515, Supplier 1=Digi-Key, Termination=SMD/SMT, Thickness=0.035inch, Voltage Rating (DC)=10V, Weight=7.1E-05oz, Width=0.031inch
C5 C11: library part CC0603KRX5R8BB225, "CAP CER 2.2UF 25V X5R 0603", Case Code (Imperial)=0603, Case Code (Metric)=1608, Dielectric=X5R, LCSC Part Number=C309478, Manufacturer=Yageo, Max Operating Temperature=85°C, Min Operating Temperature=-55°C, Package Quantity=4000, Resistor Type=Ceramic, Supplier Part Number 1=311-1786-1-ND, Tolerance=10%, Voltage Rating=25V, Capacitance=2.2uF, Case/Package=0603, ComponentLink1Description=https://www.verical.com/server-webapp/html/getDatasheet?partID=782757&src-supplier=Verical, ComponentLink1URL=https://www.verical.com/server-webapp/html/getDatasheet?partID=782757&src-supplier=Verical, Depth=0.8mm, Halogen Free="Halogen Free", Lead Free="Lead Free", Length=1.6mm, Manufacturer Part Number=CC0603KRX5R8BB225, Mount="Surface Mount", Packaging="Tape and Reel", Pricing 1="1=0.4, 10=0.276, 50=0.1932, 100=0.1656, 500=0.1242, 1000=0.10488 (USD)", Radiation Hardening=No, RoHS Compliant=Yes, Stock 1=687936, Supplier 1=Digi-Key, Termination=SMD/SMT, Thickness=0.037inch, Voltage Rating (DC)=25V, Weight=7.1E-05oz, Width=0.031inch
C7: library part CC0603JRNPO9BN103, "CAP CER 10000PF 50V C0G/NPO 0603", Case/Package=0603, LCSC Part Number=C389113, Manufacturer=Yageo, Max Operating Temperature=125°C, Min Operating Temperature=-55°C, Tolerance=5%, Voltage Rating=50V, Capacitance=10nF, Category="Ceramic Capacitors", ComponentLink1Description=http://www.yageo.com/documents/recent/UPY-GP_NP0_16V-to-50V_16.pdf?src-supplier=Digi-Key, ComponentLink1URL=http://www.yageo.com/documents/recent/UPY-GP_NP0_16V-to-50V_16.pdf?src-supplier=Digi-Key, ComponentLink2Description=http://www.yageo.com/exep/pages/download/literatures/ProductSelectionGuide%202014_Final_2.pdf?src-supplier=Digi-Key, ComponentLink2URL=http://www.yageo.com/exep/pages/download/literatures/ProductSelectionGuide%202014_Final_2.pdf?src-supplier=Digi-Key, Item Type=Capacitor, Length=0.063inch, Manufacturer Part Number=CC0603JRNPO9BN103, Mount="Surface Mount", Packaging="Tape and Reel", Pricing 1="1=0.42340, 10=0.29770, 25=0.25590, 100=0.19550, 250=0.19360, 500=0.14320, 1000=0.12060, 3000=0.11930 (USD)", RoHS=Yes, RoHS Compliant=Yes, Stock 1=5425, Supplier 1="Arrow Electronics", Supplier Part Number 1=CC0603JRNPO9BN103, Thickness=0.035inch, Width=0.031inch
C9: library part UUD1H101MNL1GS, "CAP ALUM 100UF 20% 50V SMD", Case/Package=Radial, Dielectric Material=Aluminium, LCSC Part Number=C116241, Leakage Current=3uA, Manufacturer=Nichicon, Max Operating Temperature=105°C, Min Operating Temperature=-55°C, Package Quantity=500, Ripple Current=300mA, Supplier Part Number 1=493-2306-6-ND, Tolerance=20%, Voltage=50V, Capacitance=100uF, Category="Aluminum Electrolytic Capacitors", ComponentLink1Description=https://datasheet.ciiva.com/6002/66055-6002224.pdf?src-supplier=Farnell, ComponentLink1URL=https://datasheet.ciiva.com/6002/66055-6002224.pdf?src-supplier=Farnell, ComponentLink2Description=https://datasheet.ciiva.com/11781/0900766b80fa39e7-11781901.pdf?src-supplier=RSComponents, ComponentLink2URL=https://datasheet.ciiva.com/11781/0900766b80fa39e7-11781901.pdf?src-supplier=RSComponents, ComponentLink3Description=https://datasheet.ciiva.com/97/e-ud-97939.pdf?src-supplier=Digi-Key, ComponentLink3URL=https://datasheet.ciiva.com/97/e-ud-97939.pdf?src-supplier=Digi-Key, ComponentLink4Description=https://datasheet.ciiva.com/97/e-ud-97940.pdf?src-supplier=Digi-Key, ComponentLink4URL=https://datasheet.ciiva.com/97/e-ud-97940.pdf?src-supplier=Digi-Key, ComponentLink5Description=https://datasheet.ciiva.com/97/e-ud-97941.pdf?src-supplier=Digi-Key, ComponentLink5URL=https://datasheet.ciiva.com/97/e-ud-97941.pdf?src-supplier=Digi-Key, ComponentLink6Description=https://datasheet.ciiva.com/28458/e-ud-28458117.pdf?src-supplier=Element14, ComponentLink6URL=https://datasheet.ciiva.com/28458/e-ud-28458117.pdf?src-supplier=Element14, ComponentLink7Description=https://datasheet.ciiva.com/28458/1910936-28458133.pdf?src-supplier=Element14, ComponentLink7URL=https://datasheet.ciiva.com/28458/1910936-28458133.pdf?src-supplier=Element14, ComponentLink8Description=https://datasheet.ciiva.com/5362/e-ud-5362134.pdf?src-supplier=Mouser, ComponentLink8URL=https://datasheet.ciiva.com/5362/e-ud-5362134.pdf?src-supplier=Mouser, ComponentLink9Description=https://datasheet.ciiva.com/7781/66055-7781450.pdf?src-supplier=Element14, ComponentLink9URL=https://datasheet.ciiva.com/7781/66055-7781450.pdf?src-supplier=Element14, ComponentLink10Description=https://datasheet.ciiva.com/17354/e-ud-17354671.pdf?src-supplier=Avnet+Europe, ComponentLink10URL=https://datasheet.ciiva.com/17354/e-ud-17354671.pdf?src-supplier=Avnet+Europe, Construction=Cylindrical, Diameter=8mm, Dissipation Factor=0.14%, Height=10mm, Height - Seated (Max)=0.394inch, Impedance=340mR, Item Type=Capacitor, Lead Diameter=1.1mm, Lead Free="Lead Free", Lead Pitch=3.1mm, Length=10mm, Life (Hours)=5000Hour, Manufacturer Part Number=UUD1H101MNL1GS, Number of Pins=2, Packaging="Tape and Reel", Pricing 1="1=0.62000, 10=0.44000, 50=0.33300, 100=0.29000 (USD)", Radiation Hardening=No, REACH SVHC="No SVHC", Ripple Current (AC)=300mA, RoHS=Yes, RoHS Compliant=Yes, Series=UD, Supplier 1=Digi-Key, Termination=SMD/SMT, Voltage Rating=50V, Voltage Rating (DC)=50V
C12 C15: library part CC0402KRX7R9BB103, "CAP CER 10000PF 50V X7R 0402", Case Code (Imperial)=0402, Case Code (Metric)=1005, Dielectric=X7R, LCSC Part Number=C60133, Manufacturer=Yageo, Max Operating Temperature=125°C, Min Operating Temperature=-55°C, Package Quantity=1, Resistor Type=Ceramic, Tolerance=10%, Voltage=50V, Capacitance=10nF, Case/Package=0402, Category="Ceramic Capacitors", ComponentLink1Description=https://datasheet.ciiva.com/11788/0900766b8079c870-11788375.pdf?src-supplier=RSComponents, ComponentLink1URL=https://datasheet.ciiva.com/11788/0900766b8079c870-11788375.pdf?src-supplier=RSComponents, ComponentLink2Description=https://datasheet.ciiva.com/26862/getdatasheetpartid-138248-26862642.pdf?src-supplier=Verical, ComponentLink2URL=https://datasheet.ciiva.com/26862/getdatasheetpartid-138248-26862642.pdf?src-supplier=Verical, ComponentLink3Description=https://datasheet.ciiva.com/7978/1489800-7978093.pdf?src-supplier=Element14, ComponentLink3URL=https://datasheet.ciiva.com/7978/1489800-7978093.pdf?src-supplier=Element14, ComponentLink4Description=https://datasheet.ciiva.com/28450/1489800-28450377.pdf?src-supplier=Element14, ComponentLink4URL=https://datasheet.ciiva.com/28450/1489800-28450377.pdf?src-supplier=Element14, ComponentLink5Description=https://datasheet.ciiva.com/176/mlccorderingcode-176349.pdf?src-supplier=Digi-Key, ComponentLink5URL=https://datasheet.ciiva.com/176/mlccorderingcode-176349.pdf?src-supplier=Digi-Key, ComponentLink6Description=https://datasheet.ciiva.com/176/mlccorderingcode-176348.pdf?src-supplier=Digi-Key, ComponentLink6URL=https://datasheet.ciiva.com/176/mlccorderingcode-176348.pdf?src-supplier=Digi-Key, ComponentLink7Description=https://datasheet.ciiva.com/176/mlccorderingcode-176350.pdf?src-supplier=Digi-Key, ComponentLink7URL=https://datasheet.ciiva.com/176/mlccorderingcode-176350.pdf?src-supplier=Digi-Key, Depth=0.5mm, Halogen Free="Halogen Free", Height=0.5mm, Item Type=Capacitor, Lead Free="Lead Free", Length=1mm, Manufacturer Part Number=CC0402KRX7R9BB103, Mount="Surface Mount", Packaging="Tape and Reel", Pricing 1="10000=0.00178 (USD)", Radiation Hardening=No, Reach SVHC Compliant=Yes, RoHS=Yes, RoHS Compliant=Yes, Series=CC, Stock 1=995000, Supplier 1=Avnet, Supplier Part Number 1=CC0402KRX7R9BB103, Termination=SMD/SMT, Thickness=0.022inch, Voltage Rating=50V, Voltage Rating (DC)=50V, Width=0.02inch
C17 C19: library part VUA270M1VTR-0606, "27uF 35V ±20% SMD,D6.3xL5.7mm Aluminum Electrolytic Capacitors - SMD ROHS", LCSC Part Number=C249807, Manufacturer=Lelon, Package=SMD,D6.3xL5.7mm, ComponentLink1Description=LCSC, ComponentLink1URL=https://www.lcsc.com/product-detail/Aluminum-Electrolytic-Capacitors-SMD_Lelon-VUA270M1VTR-0606_C249807.html, Item Type=Capacitor, Manufacturer Part Number=VUA270M1VTR-0606
C22: library part CA45-A-10V-10uF-K, "10uF 10V 8Ω@100kHz ±10% CASE-A-3216 Tantalum Capacitors ROHS", LCSC Part Number=C128253, Manufacturer="CEC(Shenzhen Zhenhua XinYun Elec)", Package=CASE-A-3216, ComponentLink1Description=LCSC, ComponentLink1URL=https://www.lcsc.com/product-detail/Tantalum-Capacitors_CEC-Shenzhen-Zhenhua-XinYun-Elec-CA45-A-10V-10uF-K_C128253.html, Item Type=Capacitor, Manufacturer Part Number=CA45-A-10V-10uF-K
C28 C29: library part CC0603JRNPO9BN200, "CAP CER 20PF 50V C0G/NPO 0603", Case Code (Imperial)=0603, Case Code (Metric)=1608, Dielectric=C0G, LCSC Part Number=C105621, Manufacturer=Yageo, Max Operating Temperature=125°C, Min Operating Temperature=-55°C, Package Quantity=4000, Supplier Part Number 1=311-1424-6-ND, Tolerance=5%, Voltage Rating=50V, Capacitance=20pF, Case/Package=0603, ComponentLink1Description=http://www.farnell.com/datasheets/1132289.pdf?src-supplier=Element14, ComponentLink1URL=http://www.farnell.com/datasheets/1132289.pdf?src-supplier=Element14, ComponentLink2Description=http://www.yageo.com/documents/recent/UPY-GP_NP0_16V-to-50V_16.pdf?src-supplier=Digi-Key, ComponentLink2URL=http://www.yageo.com/documents/recent/UPY-GP_NP0_16V-to-50V_16.pdf?src-supplier=Digi-Key, Composition=Ceramic, Depth=0.8mm, Lead Free="Lead Free", Length=1.6mm, Manufacturer Part Number=CC0603JRNPO9BN200, Mount="Surface Mount", Number of Pins=2, Packaging="Tape and Reel", Pricing 1="1=0.1, 10=0.048, 100=0.0214, 500=0.01526, 1000=0.01198 (USD)", REACH SVHC=Unknown, Stock 1=259568, Supplier 1=Digi-Key, Termination=SMD/SMT, Thickness=0.035inch, Voltage Rating (DC)=50V, Weight=7.1E-05oz, Width=0.8mm
C30 C31: library part CC0603JRNPO9BN100, "CAP CER 10PF 50V C0G/NPO 0603", Case Code (Imperial)=0603, Case Code (Metric)=1608, Dielectric=C0G, Insulation Resistance=100GR, LCSC Part Number=C106245, Manufacturer=Yageo, Max Operating Temperature=125°C, Min Operating Temperature=-55°C, Package Quantity=1, Resistor Type=Ceramic, Supplier Part Number 1=311-1058-1-ND, Temperature Coefficient=30ppm/°C, Tolerance=5%, Voltage=50V, Capacitance=10pF, Case/Package=0603, Category="Ceramic Capacitors", ComponentLink1Description=https://datasheet.ciiva.com/25787/cl10a475ka8nqnc-25787017.pdf?src-supplier=Digi-Key, ComponentLink1URL=https://datasheet.ciiva.com/25787/cl10a475ka8nqnc-25787017.pdf?src-supplier=Digi-Key, ComponentLink2Description=https://datasheet.ciiva.com/144/mlccorderingcode-144651.pdf?src-supplier=Digi-Key, ComponentLink2URL=https://datasheet.ciiva.com/144/mlccorderingcode-144651.pdf?src-supplier=Digi-Key, ComponentLink3Description=https://datasheet.ciiva.com/11786/0900766b8079c870-11786407.pdf?src-supplier=RSComponents, ComponentLink3URL=https://datasheet.ciiva.com/11786/0900766b8079c870-11786407.pdf?src-supplier=RSComponents, ComponentLink4Description=https://datasheet.ciiva.com/5789/1734582-5789616.pdf?src-supplier=Farnell, ComponentLink4URL=https://datasheet.ciiva.com/5789/1734582-5789616.pdf?src-supplier=Farnell, ComponentLink5Description=https://datasheet.ciiva.com/26862/getdatasheetpartid-403524-26862758.pdf?src-supplier=Verical, ComponentLink5URL=https://datasheet.ciiva.com/26862/getdatasheetpartid-403524-26862758.pdf?src-supplier=Verical, ComponentLink6Description=https://datasheet.ciiva.com/7978/1132289-7978126.pdf?src-supplier=Element14, ComponentLink6URL=https://datasheet.ciiva.com/7978/1132289-7978126.pdf?src-supplier=Element14, ComponentLink7Description=https://datasheet.ciiva.com/46430/1835847-46430150.pdf?src-supplier=Element14, ComponentLink7URL=https://datasheet.ciiva.com/46430/1835847-46430150.pdf?src-supplier=Element14, ComponentLink8Description=https://datasheet.ciiva.com/144/mlccorderingcode-144650.pdf?src-supplier=Digi-Key, ComponentLink8URL=https://datasheet.ciiva.com/144/mlccorderingcode-144650.pdf?src-supplier=Digi-Key, ComponentLink9Description=https://datasheet.ciiva.com/144/mlccorderingcode-144649.pdf?src-supplier=Digi-Key, ComponentLink9URL=https://datasheet.ciiva.com/144/mlccorderingcode-144649.pdf?src-supplier=Digi-Key, ComponentLink10Description=https://datasheet.ciiva.com/5425/upy-gp-np0-16v-to-50v-8-5425564.pdf?src-supplier=Mouser, ComponentLink10URL=https://datasheet.ciiva.com/5425/upy-gp-np0-16v-to-50v-8-5425564.pdf?src-supplier=Mouser, ComponentLink11Description=https://datasheet.ciiva.com/8033/1734582-8033710.pdf?src-supplier=Element14, ComponentLink11URL=https://datasheet.ciiva.com/8033/1734582-8033710.pdf?src-supplier=Element14, ComponentLink12Description=https://datasheet.ciiva.com/8033/1734582-8033706.pdf?src-supplier=Element14, ComponentLink12URL=https://datasheet.ciiva.com/8033/1734582-8033706.pdf?src-supplier=Element14, Depth=0.8mm, Height=0.8mm, Lead Free="Lead Free", Length=1.6mm, Manufacturer Part Number=CC0603JRNPO9BN100, Mount="Surface Mount", Number of Pins=2, Packaging="Tape and Reel", Pricing 1="1=0.10000, 10=0.03900, 50=0.02120, 100=0.01740, 500=0.01240, 1000=0.00974 (USD)", Radiation Hardening=No, REACH SVHC="No SVHC", RoHS=Yes, RoHS Compliant=Yes, Series=CC, Stock 1=1700978, Supplier 1=Digi-Key, Termination=SMD/SMT, Thickness=0.035inch, Voltage Rating=50V, Voltage Rating (DC)=50V, Width=0.031inch
C33 C34 C35 C39 C40 C41: library part CC0402KRX5R7BB223, "CAP CER 0.022UF 16V X5R 0402", Case Code (Imperial)=0402, Case Code (Metric)=1005, Dielectric=X5R, LCSC Part Number=C541399, Manufacturer=Yageo, Max Operating Temperature=85°C, Min Operating Temperature=-55°C, Supplier Part Number 1=603-CC402KRX5R7BB223, Tolerance=10%, Voltage Rating=16V, Capacitance=22nF, Case/Package=0402, Category="Ceramic Capacitors", ComponentLink1Description=http://www.yageo.com/exep/pages/download/literatures/ProductSelectionGuide%202014_Final_2.pdf?src-supplier=Digi-Key, ComponentLink1URL=http://www.yageo.com/exep/pages/download/literatures/ProductSelectionGuide%202014_Final_2.pdf?src-supplier=Digi-Key, ComponentLink2Description=http://www.yageo.com/documents/recent/UPY-GPHC_X5R_4V-to-50V_25.pdf?src-supplier=Digi-Key, ComponentLink2URL=http://www.yageo.com/documents/recent/UPY-GPHC_X5R_4V-to-50V_25.pdf?src-supplier=Digi-Key, Halogen Free="Halogen Free", Lead Free="Lead Free", Length=0.039inch, Manufacturer Part Number=CC0402KRX5R7BB223, Mount="Surface Mount", Packaging="Tape and Reel", Pricing 1="1=0.10000, 10=0.05600, 50=0.05600, 100=0.02500, 1000=0.01400, 10000=0.01000 (USD)", RoHS=Yes, RoHS Compliant=Yes, Stock 1=31160, Supplier 1=Mouser, Thickness=0.022inch, Voltage Rating (DC)=16V, Width=0.02inch
D1: "40V 650mV@10A 10A SMC(DO-214AB) Schottky Barrier Diodes (SBD) ROHS", LCSC Part Number=C59500, Manufacturer=MDD, Package=SMC(DO-214AB), ComponentLink1Description=LCSC, ComponentLink1URL=https://www.lcsc.com/product-detail/Schottky-Barrier-Diodes-SBD_MDD-Microdiode-Electronics-SK104C_C59500.html, Item Type=Diode, Manufacturer Part Number=SK104C
D2: "58.1V 40V 36V Bi-Directional SMB(DO-214AA) TVS ROHS", LCSC Part Number=C556189, Manufacturer="Slkor(SLKORMICRO Elec.)", Package=SMB(DO-214AA), ComponentLink1Description=LCSC, ComponentLink1URL=https://www.lcsc.com/product-detail/span-style-background-color-ff0-TVS-span_Slkor-SLKORMICRO-Elec-SMBJ36CA_C556189.html, Item Type=Diode, Manufacturer Part Number=SMBJ36CA
D3: "200V 900mV@2A 2A SMB(DO-214AA) Schottky Barrier Diodes (SBD) ROHS", Average Rectified Current=2A, LCSC Part Number=C725397, Manufacturer=MCC, Max Reverse Voltage (DC)=200V, Package Quantity=3000, Supplier Part Number 1=833-SK220-LTP, Category="Rectifier Diodes", ComponentLink1Description=https://datasheet.ciiva.com/6377/sk22-lsk220-ldo-214aa-6377942.pdf?src-supplier=Digi-Key, ComponentLink1URL=https://datasheet.ciiva.com/6377/sk22-lsk220-ldo-214aa-6377942.pdf?src-supplier=Digi-Key, Item Type=Diode, Lead Free="Lead Free", Manufacturer Part Number=SK220-LTP, Mounting Technology="Surface Mount", Packaging="Tape and Reel", Pricing 1="1=0.47, 10=0.364, 50=0.364, 100=0.227, 1000=0.12, 10000=0.092 (USD)", RoHS=Yes, RoHS Compliant=Yes, Series=-, Stock 1=5871, Supplier 1=Mouser
D4 D5 D6 D16 D17 D18: "DIODE GEN PURP 100V 300MA SOD123", Average Rectified Current=300mA, Current Rating=150mA, Forward Voltage=1.25V, LCSC Part Number=C83528, Manufacturer=Diodes, Max Forward Surge Current (Ifsm)=2A, Max Operating Temperature=150°C, Max Repetitive Reverse Voltage (Vrrm)=100V, Max Reverse Current=1uA, Min Operating Temperature=-65°C, Package Quantity=3000, Power Dissipation=400mW, Supplier Part Number 1=7634694, Voltage Rating (DC)=75V, Category="Rectifier Diodes", ComponentLink1Description=https://datasheet.ciiva.com/1179/1915529-1179304.pdf?src-supplier=Element14, ComponentLink1URL=https://datasheet.ciiva.com/1179/1915529-1179304.pdf?src-supplier=Element14, ComponentLink2Description=https://datasheet.ciiva.com/22695/1915529-22695239.pdf?src-supplier=Element14, ComponentLink2URL=https://datasheet.ciiva.com/22695/1915529-22695239.pdf?src-supplier=Element14, ComponentLink3Description=https://datasheet.ciiva.com/8300/ds30086-8300392.pdf?src-supplier=Avnet, ComponentLink3URL=https://datasheet.ciiva.com/8300/ds30086-8300392.pdf?src-supplier=Avnet, ComponentLink4Description=https://datasheet.ciiva.com/15219/getdatasheetpartid-110030-15219548.pdf?src-supplier=Verical, ComponentLink4URL=https://datasheet.ciiva.com/15219/getdatasheetpartid-110030-15219548.pdf?src-supplier=Verical, ComponentLink5Description=https://datasheet.ciiva.com/8303/ds30086-8303197.pdf?src-supplier=Avnet, ComponentLink5URL=https://datasheet.ciiva.com/8303/ds30086-8303197.pdf?src-supplier=Avnet, ComponentLink6Description=https://datasheet.ciiva.com/911/ds30086-911735.pdf?src-supplier=Digi-Key, ComponentLink6URL=https://datasheet.ciiva.com/911/ds30086-911735.pdf?src-supplier=Digi-Key, ComponentLink7Description=https://datasheet.ciiva.com/911/ds30086-911736.pdf?src-supplier=Digi-Key, ComponentLink7URL=https://datasheet.ciiva.com/911/ds30086-911736.pdf?src-supplier=Digi-Key, ComponentLink8Description=https://datasheet.ciiva.com/911/ds30086-911734.pdf?src-supplier=Digi-Key, ComponentLink8URL=https://datasheet.ciiva.com/911/ds30086-911734.pdf?src-supplier=Digi-Key, ComponentLink9Description=https://datasheet.ciiva.com/4435/ds30086-4435128.pdf?src-supplier=Mouser, ComponentLink9URL=https://datasheet.ciiva.com/4435/ds30086-4435128.pdf?src-supplier=Mouser, Contact Plating=Tin,Matte, Element Configuration=Single, Forward Current=150mA, Height=1.25mm, Item Type=Diode, Lead Free="Lead Free", Length=2.85mm, Manufacturer Part Number=1N4148W-7-F, Max Reverse Voltage (DC)=100V, Max Surge Current=2A, Mounting Technology="Surface Mount", Output Current=150mA, Packaging="Tape and Reel", Peak Non-Repetitive Surge Current=2A, Pins=2, Polarity=Standard, Power Rating=400mW, Pricing 1="3000=0.01840, 12000=0.01760, 45000=0.01690, 120000=0.01640, 300000=0.01560 (USD)", Radiation Hardening=No, Reach SVHC Compliant=Yes, Recovery Time=4ns, Reverse Recovery Time=4ns, Reverse Recovery Time-Max=4ns, RoHS=Yes, RoHS Compliant=Yes, Series=-, Stock 1=32931000, Supplier 1="Future Electronics", Voltage=100V, Weight=0.000353oz, Width=1.7mm